# Altium PCB Copy of PCB1.PcbDoc
Units mil, origin at the board's own origin, x right, y up, seen from the top; angles counter-clockwise.
Board outline 6395 x 5300 mil, 2 copper layers (Top Layer, Bottom Layer); 75 components, 141 nets, 408 pads, 2 vias.
Unrouted connection lines stored in the file: 186.
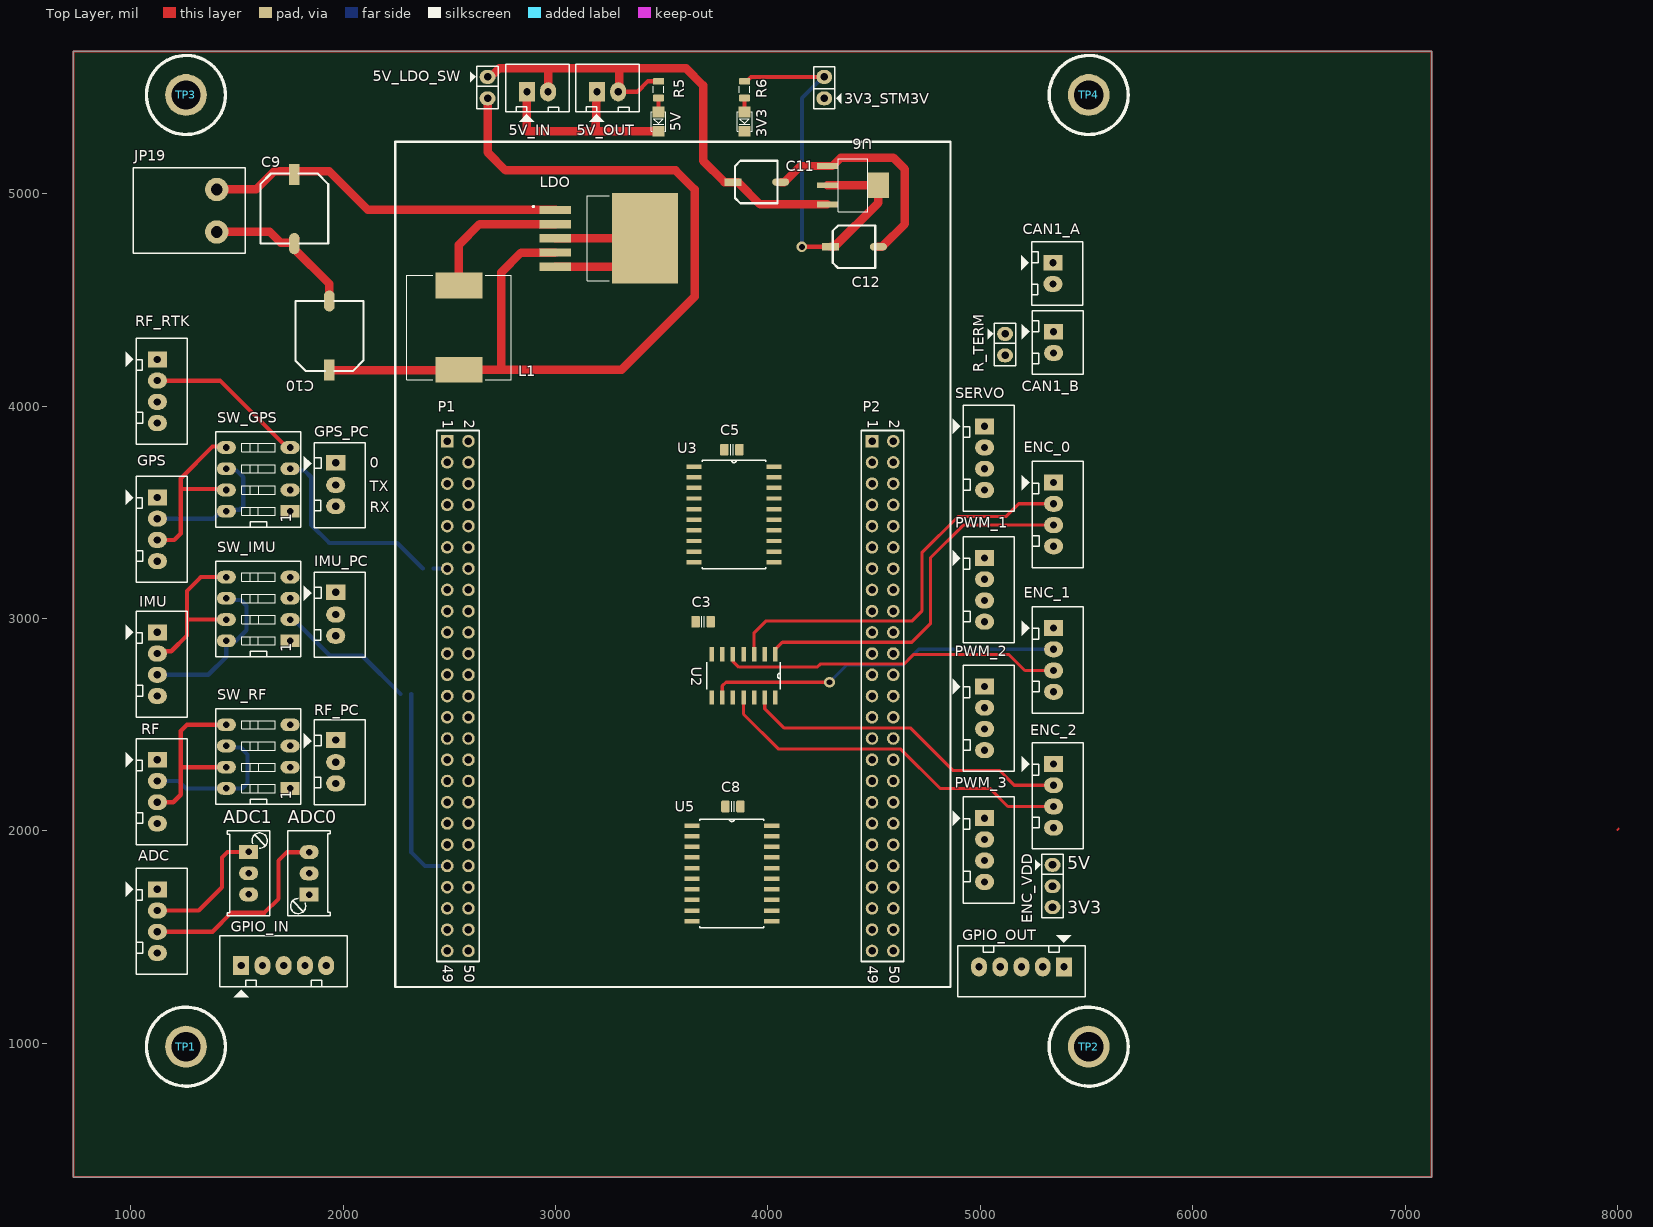
[diagram p0: Top Layer view]
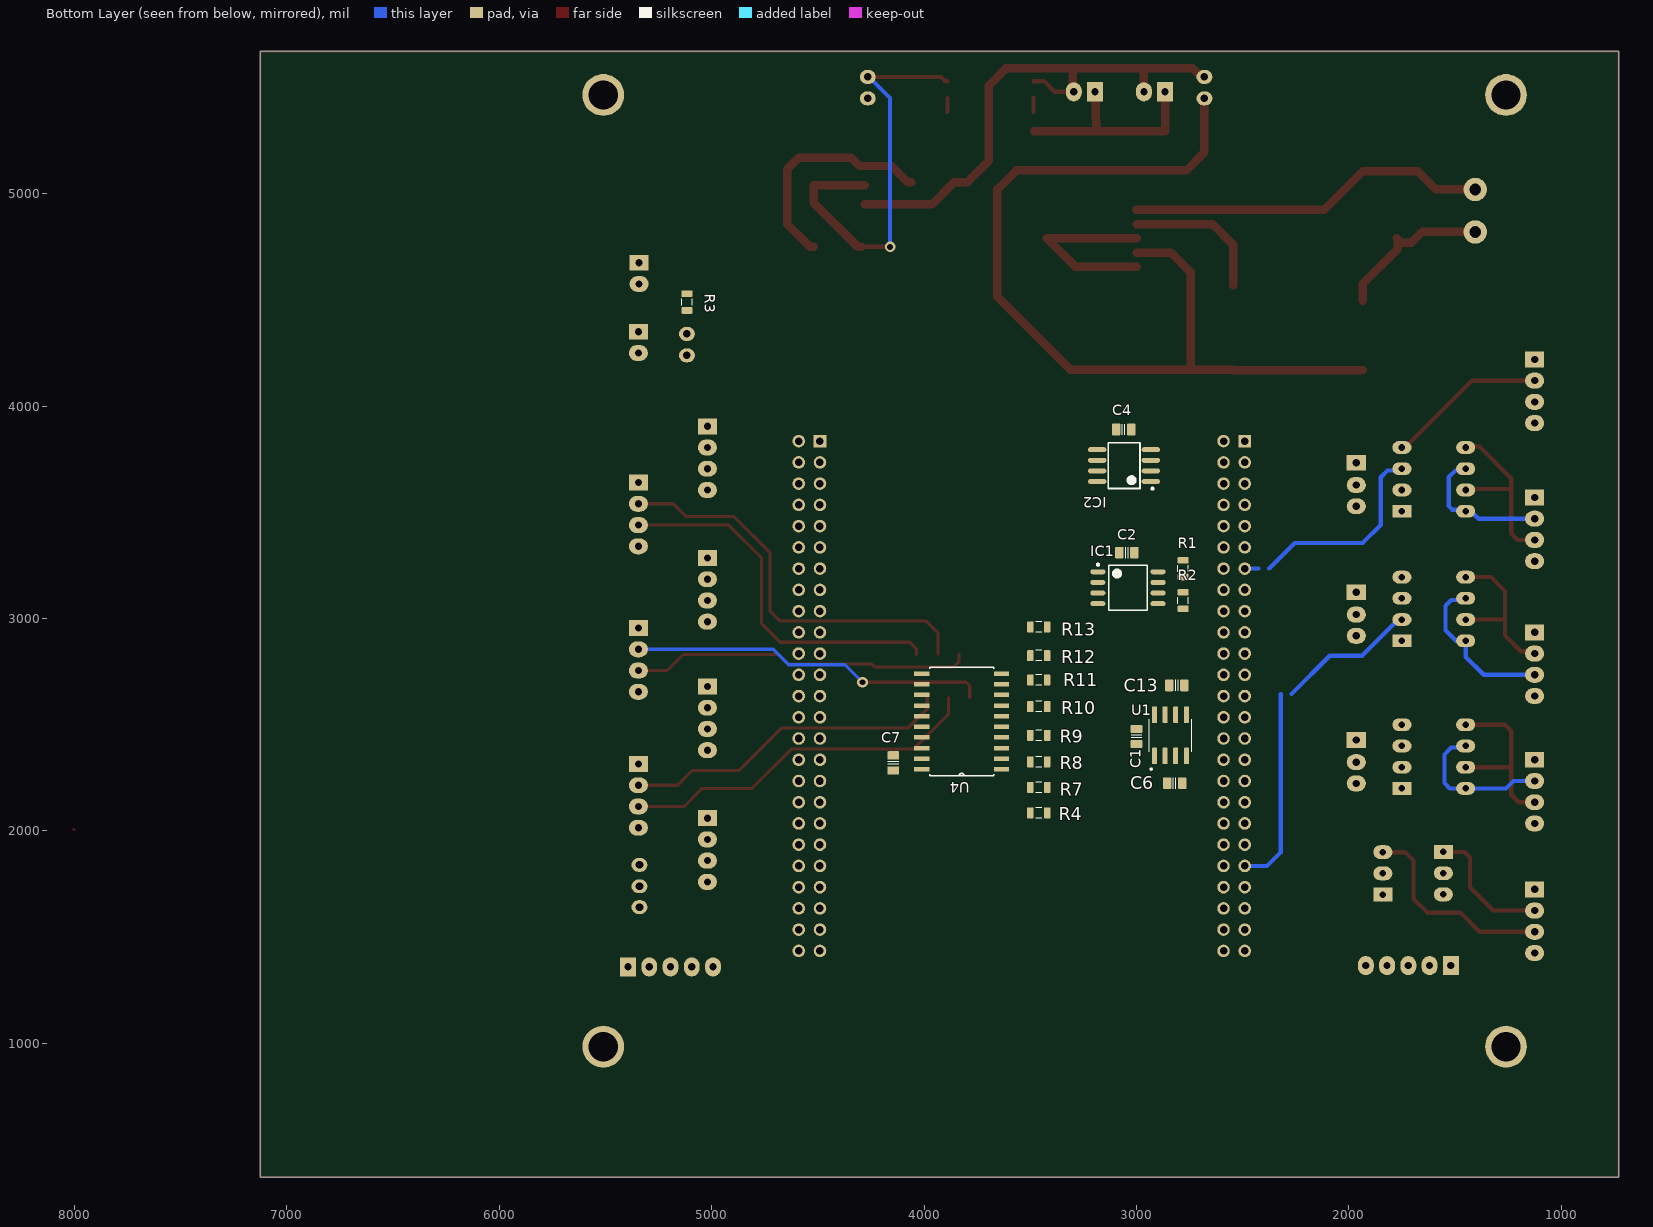
[diagram p1: Bottom Layer view, seen from below]

## Layer stack, top to bottom
Top Solder: solder mask 0.4, Solder Resist, Dk 3.5
Top Layer: signal copper 1.4
Dielectric 1: dielectric 12.6, FR-4, Dk 4.8
Bottom Layer: signal copper 1.4
Bottom Solder: solder mask 0.4, Solder Resist, Dk 3.5

## Board outline
730,370 730,5670 7125,5670 7125,4172.5 7125,1637.5 7125,370

## Design rules (kind name [scope] priority, off if disabled: settings)
Clearance [All] p1: gap=20 ignorepadtopadclearanceinfootprint=FALSE except(10: Arc-THPad Track-THPad; 15: Arc-Arc Arc-Track Track-Track)
PlaneConnect [All] p1: planeconnectstyle=Relief reliefexpansion=20 reliefentries=4 reliefconductorwidth=20 reliefairgap=10
PolygonConnect [All] p1: connectstyle=Relief reliefconductorwidth=20 reliefentries=4 polygonreliefangle="90 Angle" airgapwidth=10
RoutingVias [All] p1: holewidth=28 width=50 viastyle="Through Hole" minholewidth=28 minwidth=50 maxholewidth=28 maxwidth=50
SolderMaskExpansion [All] p1: expansion=4
Width [All] p1: maxlimit=100 minlimit=10 preferedwidth=30 toplayer_prefwidth=20 minimp=50.000000 maximp=50.000000 favimp=50.000000
29 further rules are at their usual default settings.

## Components (designator, comment, footprint, x,y, rotation, side; value= is the part's Value field where it differs from the comment)
3V3 "LED SMD" SM-LED-0805-Red 3890,5385 r270 top
3V3_STM3V "connector" JP2 4265,5449 r90 top
5V "LED SMD" SM-LED-0805-Red 3485,5385 r270 top
5V_IN "connector" CON2 2865,5480 r0 top
5V_LDO_SW "connector" JP2 2680,5550 r270 top
5V_OUT "connector" CON2 3195,5480 r0 top
ADC "JP4" CON4 1125,1725 r270 top value="Connector 4"
ADC0 "10K" VR1 1840,1700 r90 top value="VR 10K"
ADC1 "10K" VR1 1555,1901 r270 top value="VR 10K"
C1 "approved sub OK" CAPC2012X135N 3000,2444.57 r90 bottom value=100nF
C2 "approved sub OK" CAPC2012X135N 3045,3310 r180 bottom value=100nF
C3 "approved sub OK" CAPC2012X135N 3695,2985 r0 top value=100nF
C4 "approved sub OK" CAPC2012X135N 3060,3890 r180 bottom value=100nF
C5 "approved sub OK" CAPC2012X135N 3830,3795 r180 top value=100nF
C6 "approved sub OK" CAPC2012X135N 2820,2225 r180 bottom value=3n3
C7 "approved sub OK" CAPC2012X135N 4145,2320 r270 bottom value=100nF
C8 "approved sub OK" CAPC2012X135N 3835,2115 r180 top value=100nF
C9 "330uF/35V" "cap_A_SMD 470uF/16V" 1605,4765 r0 top
C10 "1000uF/10V" "cap_A_SMD 470uF/16V" 2100,4495 r180 top
C11 "10uF/16V" "cap_A_SMD 10uF/16V" 4030,4980 r90 top
C12 "10uF/16V" "cap_A_SMD 10uF/16V" 4490,4675 r90 top
C13 "approved sub OK" CAPC2012X135N 2810,2685 r0 bottom value=3n3
CAN1_A "JP2" CON2 5341.5,4675 r270 top value="Connector 2"
CAN1_B "JP2" CON2 5345,4350.04 r270 top value="Connector 2"
ENC_0 "Front-Motor" CON4 5345,3640 r270 top value="Connector 4"
ENC_1 "Left-Motor" CON4 5345,2955 r270 top value="Connector 4"
ENC_2 "Right-Motor" CON4 5345,2315 r270 top value="Connector 4"
ENC_VDD "SW" JP3 5340,1740 r270 top value=J2-1
GPIO_IN "GPIO_IN" CON5 1520,1366 r0 top value="Connector 5"
GPIO_OUT "GPIO_OUT" CON5 5393.7,1360 r180 top value="Connector 5"
GPS "GPS" CON4 1125,3570 r270 top value="Connector 4"
GPS_PC "GPS_PC" CON3 1965,3728.5 r270 top value="Connector 3"
IC1 "24C08B/16B_8Lead" SOIC127P800X175-8N 3040,3145 r180 bottom value=24Cxx
IC2 "SN65HVD1050D" SO-8N 2933.14,3795 r0 bottom
IMU "IMU" CON4 1125,2935 r270 top value="Connector 4"
IMU_PC "IMU_PC" CON3 1965,3118.5 r270 top value="Connector 3"
JP19 "7-24V INPUT" "MSTB 2/5.08mm" 1405,4820 r90 top
L1 "100uH/3A" IND_B82477P4104M000 2545,4370 r270 top
LDO "LM2596S-5.0" TO170P1524X483-6N 3250,4790 r0 top
P1 "STMF4_1" HDR2X25 2490,3835 r270 top locked
P2 "STMF4_2" HDR2X25 4490,3835 r270 top locked
PWM_1 "Front-Motor" CON4 5020,3285 r270 top value="Connector 4"
PWM_2 "Left-Motor" CON4 5020,2680 r270 top value="Connector 4"
PWM_3 "Right-Motor" CON4 5020,2060 r270 top value="Connector 4"
R1 "Jumper" RESC2012N_ZERO 2780,3235 r270 bottom value=4k7
R2 "Jumper" RESC2012N_ZERO 2780,3085 r90 bottom value=4k7
R3 "Jumper" RESC2012N_ZERO 5116.5,4490 r270 bottom value=120R
R4 "10k" RESC2012N_ZERO 3460,2085 r180 bottom
R5 "Jumper" RESC2012N_ZERO 3485,5490 r270 top value=330R
R6 "Jumper" RESC2012N_ZERO 3890,5490 r270 top value=330R
R7 "10k" RESC2012N_ZERO 3460,2205 r180 bottom
R8 "10k" RESC2012N_ZERO 3460,2325 r180 bottom
R9 "10k" RESC2012N_ZERO 3460,2450 r180 bottom
R10 "10k" RESC2012N_ZERO 3460,2585 r0 bottom
R11 "10k" RESC2012N_ZERO 3460,2710 r0 bottom
R12 "10k" RESC2012N_ZERO 3460,2825 r0 bottom
R13 "10k" RESC2012N_ZERO 3460,2960 r0 bottom
R_TERM "Jumper 2" JP2 5116.5,4340 r270 top value="JP 2"
RF "RF" CON4 1125,2335 r270 top value="Connector 4"
RF_PC "RF_PC" CON3 1965,2423.5 r270 top value="Connector 3"
RF_RTK "RF_RTK" CON4 1125,4220 r270 top value="Connector 4"
SERVO "SERVO" CON4 5020,3905 r270 top value="Connector 4"
SW_GPS "Select-GPS" DIP8/W0.3K 1750,3505 r90 top value="SW - DIP4"
SW_IMU "Select-IMU" DIP8/W0.3K 1750,2895 r90 top value="SW - DIP4"
SW_RF "Select-RF" DIP8/W0.3K 1750,2200 r90 top value="SW - DIP4"
TP1 "TP" TP6 1260,984.25 r90 top value="Test Point"
TP2 "TP" TP6 5510,984.25 r90 top value="Test Point"
TP3 "TP" TP6 1260,5465 r90 top value="Test Point"
TP4 "TP" TP6 5510,5465 r90 top value="Test Point"
U1 "LM358D" SOIC127P599X175-8N 2840,2450 r90 bottom
U2 "74HC14D" SOIC127P600X175-14N 3885,2730 r270 top
U3 "74HC245D" SOIC127P1032X265-20N 3840,3490 r0 top
U4 "74HC245D" SOIC127P1032X265-20N 3823,2515 r0 bottom
U5 "74HC245D" SOIC127P1032X265-20N 3830,1800 r0 top
U6 "LM1117-3.3V" LM1117-SOP 4330,5040 r270 top

## Footprints (in the part's own frame and the unit in brackets; to place one, negate y for a bottom-side part, rotate by r counter-clockwise, add the part's x,y. Pads: shape width x height; smd on the part's side, far side on the other; paste and mask are expansions set on the pad)
"cap_A_SMD 10uF/16V" [mil]
  rect 35x80 smd: 1(75,195)
  oval 35x80 smd: 2(75,-30)
  silkscreen extent -25,-15 175,185, body extent -29,-33 179,203, height 232
"cap_A_SMD 470uF/16V" [mil]
  rect 50x100 smd: 1(165,325)
  oval 50x100 smd: 2(165,0)
  silkscreen extent 5,0 325,330, body extent 2,-12 328,342, height 469
CAPC2012X135N [mm] "Chip Capacitor, Body 2.0x1.2mm, EIA 0805, IPC Medium Density"
  round 0.254 on Mech15: 0(0,0)
  rrect25% 1x1.4 smd: 1(-0.9,0) 2(0.9,0)
  Top Layer pour cut-out: -0.675,0.7 -0.475,0.9 0.475,0.9 0.675,0.7 0.675,-0.7 0.475,-0.9 -0.475,-0.9 -0.675,-0.7
  silkscreen extent -0.15,-0.65 0.15,0.65, body extent -1.1,-0.72 1.1,0.73, height 1.34
CON2 [mil]
  rect 75x90 hole 34: 1(0,0)
  oval 75x90 hole 34: 2(100,0)
  silkscreen extent -100,-140 200,130, body extent -95,-93 196,133, height 281
CON3 [mil] "CON 3 - Header White"
  rect 75x90 hole 34: 1(-5,0)
  oval 75x90 hole 34: 2(100,0) 3(200,0)
  silkscreen extent -100,-150 300,140, body extent -94,-94 296,133, height 276
CON4 [mil]
  rect 75x90 hole 34: 1(0,0)
  oval 75x90 hole 34: 2(100,0) 3(200,0) 4(300,0)
  silkscreen extent -100,-150 400,140, body extent -90,-90 398,136, height 276
CON5 [mil] "CON5"
  rect 75x90 hole 34: 1(0,0)
  oval 75x90 hole 34: 2(100,0) 3(200,0) 4(300,0) 5(400,0)
  silkscreen extent -100,-150 500,140, body extent -93,-94 493,132, height 276
DIP8/W0.3K [mil] "8 PIN, W 400mil , L 450mil, Pin to pin 100mil For Switch"
  rect 60x90 hole 31: 1(0,0)
  oval 60x90 hole 31: 2(100,0) 3(200,0) 4(300,0) 5(300,300) 6(200,300) 7(100,300) 8(0,300)
  silkscreen extent -75,-50 375,350, body extent -80,-45 378,345, height 158
HDR2X25 [mm] "Connector; Header; 25x2 Position"
  rect 1.5x1.5 hole 0.9: 1(0,0)
  round 1.5 hole 0.9: 2(0,2.54) 3(2.54,0) 4(2.54,2.54) 5(5.08,0) 6(5.08,2.54) 7(7.62,0) 8(7.62,2.54) 9(10.16,0) 10(10.16,2.54) 11(12.7,0) 12(12.7,2.54) 13(15.24,0) 14(15.24,2.54) 15(17.78,0) 16(17.78,2.54) 17(20.32,0) 18(20.32,2.54) 19(22.86,0) 20(22.86,2.54) 21(25.4,0) 22(25.4,2.54) 23(27.94,0) 24(27.94,2.54) 25(30.48,0) 26(30.48,2.54) 27(33.02,0) 28(33.02,2.54) 29(35.56,0) 30(35.56,2.54) 31(38.1,0) 32(38.1,2.54) 33(40.64,0) 34(40.64,2.54) 35(43.18,0) 36(43.18,2.54) 37(45.72,0) 38(45.72,2.54) 39(48.26,0) 40(48.26,2.54) 41(50.8,0) 42(50.8,2.54) 43(53.34,0) 44(53.34,2.54) 45(55.88,0) 46(55.88,2.54) 47(58.42,0) 48(58.42,2.54) 49(60.96,0) 50(60.96,2.54)
  silkscreen extent -1.27,-1.27 62.23,3.81, body extent -1.27,-1.27 62.23,3.81, height 1.5
IND_B82477P4104M000 [mm]
  rect 3.1x5.6 smd: 1(-5.05,0) 2(5.05,0)
  silkscreen extent -6.25,-6.25 6.25,6.25
JP2 [mil]
  oval 65x75 hole 36: 1(0,0) 2(101,0)
  silkscreen extent -50,-81 150,50, body extent -48,-50 148,48, height 323
JP3 [mil] "Jumper 3"
  oval 65x75 hole 36: 1(-100,0) 2(1,0) 3(99,0)
  silkscreen extent -150,-81 150,50, body extent -150,-60 150,55, height 355
LM1117-SOP [mm]
  rect 0.7x2.54 smd: 1(-2.3,-1.27) 2(0,-1.27) 3(2.3,-1.27)
  rect 3x2.54 smd: 2(0,4.826)
  silkscreen extent -3.18,0 3.17,3.56, body extent -3.25,-1.78 3.25,5.18, height 1.68
"MSTB 2/5.08mm" [mil]
  round 110 hole 55.12: 1(0,0) 2(200,0)
  silkscreen extent -101,-134 302,394, body extent -100,-79 300,394, height 339
RESC2012N_ZERO [mm] "Chip Resistor, Body 2.0x1.2mm, 0805, IPC Medium Density"
  round 0.254 on Mech15: 0(0,0)
  rrect25% 0.8x1.3 smd: 1(-1,0) 2(1,0)
  Top Layer pour cut-out: -0.725,0.65 -0.525,0.85 0.525,0.85 0.725,0.65 0.725,-0.65 0.525,-0.85 -0.525,-0.85 -0.725,-0.65
  silkscreen extent -0.38,-0.64 0.38,0.64, body extent -1.1,-0.67 1.1,0.68, height 0.69
SM-LED-0805-Red [mil]
  rect 50x55 smd: 1(0,0) 2(90,0)
  silkscreen extent 0,-35 90,35, body extent 5,-25 85,25, height 43
SO-8N [mm] "SOP, 8-Leads, Body 5.3x5.3mm, Pitch 1.27mm, IPC Medium Density"
  oval 2.2x0.6 smd: 1(-0.022,3.81) 2(-0.022,2.54) 3(-0.022,1.27) 4(-0.022,0) 5(6.397,0) 6(6.397,1.27) 7(6.397,2.54) 8(6.397,3.81)
  silkscreen extent -0.35,-0.84 5.08,4.78, body extent 0.08,-0.48 6.27,4.34, height 1.7
SOIC127P599X175-8N [mm]
  rrect25% 1.97x0.6 smd: 1(-2.47,1.905) 2(-2.47,0.635) 3(-2.47,-0.635) 4(-2.47,-1.905) 5(2.47,-1.905) 6(2.47,-0.635) 7(2.47,0.635) 8(2.47,1.905)
  silkscreen extent -4.14,-2.52 1.95,2.52
SOIC127P600X175-14N [mil]
  rect 67x21 smd: 1(-102,150) 2(-102,100) 3(-102,50) 4(-102,0) 5(-102,-50) 6(-102,-100) 7(-102,-150) 8(102,-150) 9(102,-100) 10(102,-50) 11(102,0) 12(102,50) 13(102,100) 14(102,150)
  silkscreen extent -63,-172 63,172, body extent -118,-170 118,170, height 69
SOIC127P800X175-8N [mm] "SOIC, 8-Leads, Body 5.24x5.29mm, Pitch 1.27mm, IPC Medium Density"
  oval 1.8x0.6 smd: 1(-3.6,1.905) 2(-3.6,0.635) 3(-3.6,-0.635) 4(-3.6,-1.905) 5(3.6,-1.905) 6(3.6,-0.635) 7(3.6,0.635) 8(3.6,1.905)
  silkscreen extent -3.73,-2.7 2.3,2.88, body extent -3.99,-2.7 3.99,2.7, height 1.75
SOIC127P1032X265-20N [mil]
  rect 71x21 smd: 1(-188,225) 2(-188,175) 3(-188,125) 4(-188,75) 5(-188,25) 6(-188,-25) 7(-188,-75) 8(-188,-125) 9(-188,-175) 10(-188,-225) 11(188,-225) 12(188,-175) 13(188,-125) 14(188,-75) 15(188,-25) 16(188,25) 17(188,75) 18(188,125) 19(188,175) 20(188,225)
  silkscreen extent -150,-256 150,256
TO170P1524X483-6N [mm]
  rect 3.79x0.99 smd: 1(-6.4,3.4) 2(-6.4,1.7) 3(-6.4,0) 4(-6.4,-1.7) 5(-6.4,-3.4)
  rect 7.88x10.84 smd paste-6: 6(4.35,0)
  silkscreen extent -9.1,-5.08 0.09,5.08, body extent -7.18,-5.08 7.18,5.08, height 4.65
TP6 [mm] "Jac cap 6ly"
  round 5 hole 3.5: 1(0,0)
  silkscreen extent -4.72,-4.72 4.72,4.72
VR1 [mil] "Variable Resistor"
  rect 65x90 hole 30: 1(0,0)
  oval 65x90 hole 30: 2(100,0) 3(200,0)
  silkscreen extent -100,-100 301,100, body extent -88,-130 288,110, height 455

## Part data
3V3 5V: library part "LED SMD 0805"
3V3_STM3V 5V_IN 5V_LDO_SW 5V_OUT JP19: library part Con2, "connector 2"
ADC ENC_0 ENC_1 ENC_2 GPS IMU PWM_1 PWM_2 PWM_3 RF RF_RTK SERVO: library part Con4, "Connector 4"
ADC0 ADC1: library part VR, "Var Resistor"
C1 C2 C3 C4 C5 C6 C7 C8 C13: library part "CAP C_0805", "Capacitor SMD Cer 1.8nF 10% 50V X7R 0805", Manufacturer 1="AVX Corporation", Manufacturer Part Number 1=08055C182KAT2A, Operating Temperature="-55°C ~ 125°C", Package / Case="0805 (2012 metric)", Ratings="50V; X7R", Supplier Part Number 1=478-1374-1-ND, Tolerance=±10%, SCDType=source*, Supplier 1=Digi-Key
C9 C10 C11 C12: library part "CAP hoa", "Cap"
CAN1_A CAN1_B: library part Con2, "Connector 2"
ENC_VDD: library part "JP 2-1", "Jumper 2-1"
GPIO_IN GPIO_OUT: library part Con5, "Connector 5"
GPS_PC IMU_PC RF_PC: library part Con3, "Connector 3"
IC1: "Standard 2-Wire Bus Interface Serial EEPROM", Copyright by=VanDungEvn
IC2: "CAN DRIVER"
L1: library part B82477P4104M000, Package=None, Availability="In Stock", Check_prices=https://www.snapeda.com/parts/B82477P4104M000/TM+Electronics/view-part/?ref=eda, MF="TDK ELECTRONICS", MP=B82477P4104M000, Price=None, Purchase-URL=https://pricing.snapeda.com/search/part/B82477P4104M000/?ref=eda, SnapEDA_Link=https://www.snapeda.com/parts/B82477P4104M000/TM+Electronics/view-part/?ref=snap
LDO: "SIMPLE SWITCHER&reg; 4.5V to 40V, 3A Low Component Count Step-Down Regulator", Package="TO-263-5 Texas Instruments", Availability="In Stock", Check_prices=https://www.snapeda.com/parts/LM2596S-5.0/NOPB/Texas+Instruments/view-part/?ref=eda, MF="Texas Instruments", MP=LM2596S-5.0/NOPB, Price=None, Purchase-URL=https://pricing.snapeda.com/search/part/LM2596S-5.0/NOPB/?ref=eda, SnapEDA_Link=https://www.snapeda.com/parts/LM2596S-5.0/NOPB/Texas+Instruments/view-part/?ref=snap
P1 P2: library part "Header 25X2", "Header, 25-Pin, Dual row", LatestRevisionDate=17-Jul-2002, LatestRevisionNote="Re-released for DXP Platform.", Publisher="Altium Limited"
R1 R2 R3 R5 R6: library part RES_0805, "Resistor SMD chip 0.0 Ohm 0.125W 0805", Manufacturer 1="Samsung Electro-Mechanics America, Inc", Manufacturer 2="Stackpole Electronics Inc", Manufacturer 3=Yageo, Manufacturer 4="Panasonic Electronic Components", Manufacturer 5="Rohm Semiconductor", Manufacturer Part Number 1=RC2012J000CS, Manufacturer Part Number 2=RMCF0805ZT0R00, Manufacturer Part Number 3=RC0805JR-070RL, Manufacturer Part Number 4=ERJ-6GEY0R00V, Manufacturer Part Number 5=MCR10ERTJ000, Package / Case="0805 (2012 metric)", Ratings=1/8W, Supplier Part Number 1=1276-5466-6-ND, Tolerance=N/A, ComponentLink1Description=http://www.samsungsem.com/servlet/FileDownload?filename=productcatalog/pdf/Chip_Resistor.pdf, ComponentLink1URL=http://www.samsungsem.com/servlet/FileDownload?filename=productcatalog/pdf/Chip_Resistor.pdf, ComponentLink2Description=http://www.seielect.com/Catalog/SEI-RMCF_RMCP.pdf, ComponentLink2URL=http://www.seielect.com/Catalog/SEI-RMCF_RMCP.pdf, ComponentLink3Description=http://media.digikey.com/pdf/Data%20Sheets/Yageo%20PDFs/RC0805%20Pb%20Free.pdf, ComponentLink3URL=http://media.digikey.com/pdf/Data%20Sheets/Yageo%20PDFs/RC0805%20Pb%20Free.pdf, ComponentLink4Description=http://industrial.panasonic.com/www-cgi/jvcr13pz.cgi?E+PZ+3+AOA0001+ERJ6GEY0R00V+7+WW, ComponentLink4URL=http://industrial.panasonic.com/www-cgi/jvcr13pz.cgi?E+PZ+3+AOA0001+ERJ6GEY0R00V+7+WW, ComponentLink5Description=http://rohmfs.rohm.com/en/products/databook/datasheet/passive/resistor/chip_resistor/mcr_g.pdf, ComponentLink5URL=http://rohmfs.rohm.com/en/products/databook/datasheet/passive/resistor/chip_resistor/mcr_g.pdf, RoHS 1="RoHS Compliant", RoHS 2="RoHS Compliant", RoHS 3="RoHS Compliant", RoHS 4="RoHS Compliant", RoHS 5="RoHS Compliant", SCDType=spec, Supplier 1=Digi-Key, Supplier 2=Digi-Key, Supplier 3=Digi-Key, Supplier 4=Digi-Key, Supplier 5=Digi-Key, Supplier Part Number 2=RMCF0805ZT0R00DKR-ND, Supplier Part Number 3=311-0.0ARDKR-ND, Supplier Part Number 4=P0.0ADKR-ND, Supplier Part Number 5=RHM0.0CPDKR-ND
R4 R7 R8 R9 R10 R11 R12 R13: library part Res, "Res"
R_TERM: library part "JP 2"
SW_GPS SW_IMU SW_RF: library part SWDIP-4, "DIP Switch, 4 Position, SPST"
TP1 TP2 TP3 TP4: library part TP1, "Test Point"
U1: "Dual standard operational amplifier 8-SOIC 0 to 70", Package="SOIC-8 Texas Instruments", Arrow_Asia-Purchase-URL=https://snapeda.com/shop?store=Arrow+Asia&id=4793021, Arrow_Electronics-Purchase-URL=https://snapeda.com/shop?store=Arrow+Electronics&id=4793021, Check_prices=https://www.snapeda.com/parts/LM358D/Texas%20Instruments/view-part/4793021/?ref=eda, Digi-Key_Part_Number=296-1014-2-ND, DigiKey-Purchase-URL=https://snapeda.com/shop?store=DigiKey&id=4793021, MF="Texas Instruments", Mouser-Purchase-URL=https://snapeda.com/shop?store=Mouser&id=4793021, MP=LM358D, SnapEDA_Link=https://www.snapeda.com/parts/LM358D/Texas%20Instruments/view-part/4793021/?ref=snap, Texas_Instruments-Purchase-URL=https://snapeda.com/shop?store=Texas+Instruments&id=4793021
U2: "Inverter IC 6 Channel Schmitt Trigger 14-SOIC", Package="SO14-14 Nexperia USA Inc.", Availability="In Stock", Check_prices=https://www.snapeda.com/parts/74HC14D/Toshiba+Semiconductor+and+Storage/view-part/?ref=eda, MF=Toshiba, MP=74HC14D, Price=None, Purchase-URL=https://pricing.snapeda.com/search/part/74HC14D/?ref=eda, SnapEDA_Link=https://www.snapeda.com/parts/74HC14D/Toshiba+Semiconductor+and+Storage/view-part/?ref=snap
U3 U4 U5: "Transceiver, Non-Inverting 1 Element 8 Bit per Element 3-State Output 20-SOIC", Package="SOIC-20 Toshiba Semiconductor", Availability="In Stock", Check_prices=https://www.snapeda.com/parts/74HC245D/Toshiba+Semiconductor+and+Storage/view-part/?ref=eda, MF=Toshiba, MP=74HC245D, Price=None, Purchase-URL=https://pricing.snapeda.com/search/part/74HC245D/?ref=eda, SnapEDA_Link=https://www.snapeda.com/parts/74HC245D/Toshiba+Semiconductor+and+Storage/view-part/?ref=snap
U6: library part LM1117, "800mA Low-Dropout Linear Regulator", Creator="Nguyen Ba Bien", Website=http://group3i.net

## Via types
v1: diameter 50, hole 28, Top Layer to Bottom Layer, 2 vias

## Nets (pads, with @x,y where several pads share a name; then routed paths per layer and width w, separated by ;. In a path a pad name is that pad's centre, name@x,y a point inside that pad or via, vN(x,y) a via of type N, cw(c..) or ccw(c..) an arc to the next point about the centre after c; other vN are vias at no path point)
3V3: 3V3_STM3V.2 C2.2 C4.2 C5.2 C7.2 C8.2 C12.1 ENC_VDD.3 IC1.8 IC2.3 R1.1 R2.1 R4.2 R6.1 R7.2 R8.2 R9.2 U3.1 U3.20 U4.1 U4.20 U5.1 U5.20 U6.2 | length 1998.4
  Top Layer w20: R6.1 3899.84,5529.37 3920.47,5550 3V3_STM3V.2 ; v1(4160,4750) C12.1
  Top Layer w40: U6.2@4280,5040 4520,5040 4520,4957.5 4312.5,4750 C12.1
  Bottom Layer w20: v1(4160,4750) 4160,5450 4260,5550 3V3_STM3V.2
5V: 5V_IN.2 5V_LDO_SW.1 5V_OUT.2 ADC.4 C1.2 C11.1 ENC_VDD.1 GPS.4 IMU.4 P2.3 P2.4 R5.1 RF.4 RF_RTK.4 U1.8 U6.3 | length 2536.6
  Top Layer w20: 5V_OUT.2 3385,5480 3435,5530 R5.1@3484.37,5530
  Top Layer w40: 5V_LDO_SW.1 2694.47,5550 2734.47,5590 2965,5590 ; 5V_IN.2 2965,5590 ; U6.3 3963.05,4949.45 3857.5,5055 C11.1 3795,5055 3695,5155 3695,5510 3615,5590 3300,5590 ; 2965,5590 3300,5590 ; 5V_OUT.2@3300,5492.5 3300,5590 ; 5V_OUT.2@3300,5492.5 3300,5485 5V_OUT.2 3295,5487.5 5V_OUT.2@3300,5492.5
5V_OUT: L1.1 LDO.2 | length 684.4
  Top Layer w40: L1.1 2545,4760 2641.93,4856.93 LDO.2
5V_R: 5V_LDO_SW.2 C10.1 L1.2 LDO.4 | length 4419.8
  Top Layer w40: C10.1 2543.82,4170 L1.2 2745,4171.18 ; 5V_LDO_SW.2 2680,5195 2765,5110 3565,5110 3655,5020 3655,4515 3311.18,4171.18 2745,4171.18 ; LDO.4 2838.07,4723.07 2745,4630 2745,4171.18
ADC0: ADC0.3 ADC.3 | length 975.8
  Top Layer w20: ADC.3 1385,1525 1475,1615 1630,1615 1695,1680 1695,1860 1735,1900 ADC0.3
ADC1: ADC1.1 ADC.2 | length 626.3
  Top Layer w20: ADC.2 1320,1625 1430,1735 1430,1875 1456,1901 ADC1.1
ADC1_IN14: P1.20 U1.1 U1.2
ADC2_IN13: P1.9 U1.6 U1.7
BOOT0: P2.21
CAN1_RX: P2.36
CAN1_TX: P2.33
CAN2_RX: IC2.4 P1.36
CAN2_TX: IC2.1 P1.37
EEP_SCL: IC1.6 P2.19 R1.2
EEP_SDA: IC1.5 P2.24 R2.2
ENC_A0: P1.27 U2.2
ENC_A1: P2.25 U2.6
ENC_A2: P1.15 U2.10
ENC_B0: P1.29 U2.4
ENC_B1: P2.26 U2.8 U3.6 U5.2 U5.6
ENC_B2: P2.28 U2.12
ENCA0: ENC_0.3 U2.1 | length 1756.9
  Top Layer w15: U2.1 4035,2855 4067.97,2887.97 4677.97,2887.97 4765,2975 4765,3285 4920,3440 ENC_0.3
ENCA1: ENC_1.3 U2.5 | length 1610
  Top Layer w15: U2.5 3835,2799.11 3863.11,2771 4231,2771 4245.5,2785.5 4640.5,2785.5 4685,2830 5135,2830 5210,2755 ENC_1.3
ENCA2: ENC_2.3 U2.11 | length 1718.2
  Top Layer w15: U2.11 3885,2550 4050,2385 4625,2385 4810,2200 5045,2200 5130,2115 ENC_2.3
ENCB0: ENC_0.2 U2.3 | length 1923.5
  Top Layer w15: U2.3 3935,2932.97 3990,2987.97 4677.97,2987.97 4725,3035 4725,3310 4895,3480 5120,3480 5180,3540 ENC_0.2
ENCB1: ENC_1.2 U2.9 | length 1686
  Top Layer w15: U2.9 3785,2682.61 3802.39,2700 v1(4290,2700)
  Bottom Layer w15: v1(4290,2700) 4372.03,2782.03 4637.03,2782.03 4710,2855 ENC_1.2
ENCB2: ENC_2.2 U2.13 | length 1562.1
  Top Layer w15: U2.13 3985,2575 4075,2485 4670,2485 4870,2285 5090,2285 5160,2215 ENC_2.2
GND: 3V3.2 5V.2 5V_IN.1 5V_OUT.1 ADC0.1 ADC1.3 ADC.1 C1.1 C2.1 C3.1 C4.1 C5.1 C6.2 C7.1 C8.1 C9.2 C10.2 C11.2 C12.2 C13.2 ENC_0.1 ENC_1.1 ENC_2.1 GPIO_IN.1 GPIO_OUT.1 GPS.1 GPS_PC.1 IC1.1 IC1.2 IC1.3 IC1.4 IC1.7 IC2.2 IC2.8 IMU.1 IMU_PC.1 JP19.1 LDO.3 LDO.5 LDO.6 P1.1 P1.2 P1.5 P1.23 P1.49 P1.50 P2.1 P2.2 P2.49 P2.50 PWM_1.4 PWM_2.4 PWM_3.4 R10.1 R11.1 R12.1 R13.1 RF.1 RF_PC.1 RF_RTK.1 SERVO.4 U1.4 U2.7 U3.10 U3.19 U4.10 U4.19 U5.10 U5.19 U6.1 | length 3726.5
  Top Layer w40: JP19.1 1655,4820 1705,4770 1755,4770 1770,4785 C9.2@1770,4784.49 ; C9.2@1775,4789.49 C9.2@1770,4784.49 ; C10.2 1935,4575 1770,4740 C9.2 C9.2@1770,4784.49 ; 5V_IN.1 2865,5295 3181.12,5295 3190.25,5304.13 ; LDO.3@2997.52,4789.49 LDO.3 LDO.6 3287.4,4656.14 LDO.5 ; 5V_OUT.1@3195,5475 3190.25,5304.13 ; 5V.2@3480,5295 3190,5295 3190.25,5304.13 ; C11.2 4077.5,5055 4153.05,5130.55 U6.1 4303.78,5130.55 4343.23,5170 4590,5170 4645,5115 4645,4857.5 4537.5,4750 C12.2
GPS_RX: GPS.3 SW_GPS.5 SW_GPS.7 | length 878.7
  Top Layer w20: GPS.3 1205,3370 1235,3400 1235,3610 ; SW_GPS.7 1445,3610 1235,3610 ; SW_GPS.5 1445,3810 1385,3810 1235,3660 1235,3610
GPS_RX_MCU: P1.13 SW_GPS.3 | length 1016.5
  Bottom Layer w20: SW_GPS.3 1757.65,3697.35 1817.65,3697.35 1850,3665 1850,3440 1935,3355 2255,3355 2375,3235 ; 2425,3235 P1.13
GPS_RX_PC: GPS_PC.3 SW_GPS.1
GPS_TX: GPS.2 SW_GPS.6 SW_GPS.8 | length 661.4
  Bottom Layer w20: GPS.2 1389.18,3470 1424.18,3505 SW_GPS.8 1457.65,3512.65 1512.65,3512.65 1530,3530 1530,3665 1497.65,3697.35 1457.65,3697.35 SW_GPS.6
GPS_TX_MCU: P1.14
GPS_TX_PC: GPS_PC.2 SW_GPS.2
IMU_RX: IMU.3 SW_IMU.6 SW_IMU.8 | length 775.4
  Bottom Layer w20: IMU.3 1365,2735 1450,2820 SW_IMU.8 1495,2895 1545,2945 1545,3060 1517.65,3087.35 1457.65,3087.35 SW_IMU.6
IMU_RX_MCU: P1.40 SW_IMU.3
IMU_RX_PC: IMU_PC.3 SW_IMU.1
IMU_TX: IMU.2 SW_IMU.5 SW_IMU.7 | length 782.1
  Top Layer w20: IMU.2 1135.52,2845.52 1190.52,2845.52 1265,2920 1265,2995 ; SW_IMU.7 1265,2995 ; SW_IMU.5 1330,3195 1265,3130 1265,2995
IMU_TX_MCU: P1.41 SW_IMU.4 | length 941.9
  Bottom Layer w20: 2320,2645 2320,1900 2385,1835 P1.41
IMU_TX_PC: IMU_PC.2 SW_IMU.2 | length 665
  Bottom Layer w20: SW_IMU.2 1767.43,2995 1937.43,2825 2090,2825 2270,2645
IN0: GPIO_IN.5 R4.1 U4.2
IN1: GPIO_IN.4 R7.1 U4.3
IN2: GPIO_IN.3 R8.1 U4.4
IN3: GPIO_IN.2 R9.1 U4.5
IN_0: P2.11 U4.18
IN_1: P2.14 U4.17
IN_2: P2.13 U4.16
IN_3: P2.16 U4.15
NC: P1.48
Net3V3_1: 3V3.1 R6.2 | length 65.6
  Top Layer w20: 3V3.1 R6.2
Net5V_1: 5V.1 R5.2 | length 65.6
  Top Layer w20: 5V.1 R5.2
NET_H: CAN1_A.2 CAN1_B.2 IC2.7 R3.1
NET_L: CAN1_A.1 CAN1_B.1 IC2.6 R_TERM.2
NetADC0_2: ADC0.2 C6.1 U1.3
NetADC1_2: ADC1.2 C13.1 U1.5
NetR3_2: R3.2 R_TERM.1
NRST: P1.6
OUT0: GPIO_OUT.5 U4.14
OUT1: GPIO_OUT.4 U4.13
OUT2: GPIO_OUT.3 U4.12
OUT3: GPIO_OUT.2 U4.11
OUT_0: P2.7 R10.2 U4.6
OUT_1: P2.8 R11.2 U4.7
OUT_2: P2.12 R12.2 U4.8
OUT_3: P2.9 R13.2 U4.9
PA0: P1.12
PA1: P1.11
PA4: P1.16 P1.18 U5.4
PA6: U5.3
PA7: P1.17
PA8: P2.43
PA9: P2.44
PA10: P2.41
PA13: P2.42
PA14: P2.39
PA15: P2.40
PB0: P1.22 P1.24
PB1: P1.21
PB6: P2.23
PB9: P2.20
PB10: P1.34
PB11: P1.35
PB14: P1.38
PB15: P1.39 U3.4
PC0: P1.8 U5.8
PC1: P1.7 U5.7
PC2: P1.10
PC5: P1.19 U3.8
PC6: P2.47
PC7: P2.48
PC8: P2.45
PC9: P2.46
PC10: P2.37 SW_RF.4
PC11: P2.38 SW_RF.3
PC12: P2.35
PC15: P2.10
PD2: P2.34
PD3: P2.31
PD4: P2.32
PD5: P2.29
PD6: P2.30
PD7: P2.27
PD10: P1.42 U3.3
PD11: P1.43 U3.7
PD12: P1.44
PD13: P1.45
PD14: P1.46
PD15: P1.47
PE0: P2.17
PE1: P2.18
PE2: P2.15
PE7: P1.25
PE8: P1.26
PE10: P1.28
PE12: P1.30
PE13: P1.31
PE14: P1.32
PE15: P1.33
PWM0: SERVO.1 U3.18
PWM0_DIR+: SERVO.3 U3.16
PWM0_DIR-: SERVO.2 U3.17
PWM1: PWM_1.1 U3.14
PWM1_DIR+: PWM_1.3 U3.12
PWM1_DIR-: PWM_1.2 U3.13
PWM2: PWM_2.1 U5.18
PWM2_DIR+: PWM_2.3 U5.16
PWM2_DIR-: PWM_2.2 U5.17
PWM3: PWM_3.1 U5.14
PWM3_DIR+: PWM_3.3 U5.12
PWM3_DIR-: PWM_3.2 U5.13
PWM_0: U3.2
RF_RTK_RX: RF_RTK.3
RF_RTK_TX: RF_RTK.2 SW_GPS.4 | length 755.5
  Top Layer w20: RF_RTK.2 1420,4120 1735,3805 SW_GPS.4
RF_RX: RF.3 SW_RF.5 SW_RF.7 | length 874
  Top Layer w20: RF.3 1200,2135 1235,2170 1235,2295 ; SW_RF.7 1240,2300 ; SW_RF.5 1265,2500 1235,2470 1235,2300 ; 1235,2295 1235,2300 ; 1235,2295 1240,2300 ; 1235,2300 1240,2300
RF_RX_PC: RF_PC.3 SW_RF.1
RF_TX: RF.2 SW_RF.6 SW_RF.8 | length 696.4
  Bottom Layer w20: RF.2 1225,2235 1260,2200 ; 1265,2200 1355,2200 1525,2200 1550,2225 1550,2360 1517.65,2392.35 1457.65,2392.35 SW_RF.6
RF_TX_PC: RF_PC.2 SW_RF.2
STM_3V_OUT: 3V3_STM3V.1 P2.5 P2.6
VCC_ENC: C3.2 ENC_0.4 ENC_1.4 ENC_2.4 ENC_VDD.2 U2.14
VDD_OUT: P1.3 P1.4 P2.22
VIN: C9.1 JP19.2 LDO.1 | length 1705.2
  Top Layer w40: JP19.2 1590,5020 1675,5105 1770,5105 1935,5105 2116.14,4923.86 LDO.1 LDO.1@3000,4923.86
pads on no net: C1.0 C2.0 C3.0 C4.0 C5.0 C6.0 C7.0 C8.0 C13.0 IC2.5 R1.0 R2.0 R3.0 R4.0 R5.0 R6.0 R7.0 R8.0 R9.0 R10.0 R11.0 R12.0 R13.0 TP1.1 TP2.1 TP3.1 TP4.1 U3.5 U3.9 U3.11 U3.15 U5.5 U5.9 U5.11 U5.15
copper on no net: | length 23397.1
  Top Layer w10: 8000,2004.96 8005,2009.96 ; 730,370 730,5670 1265,5670 2787.5,5670 5372.5,5670 7125,5670 7125,4172.5 7125,1637.5 7125,370 7095,370 770,370 730,370

## Silkscreen, mask and mechanical layers (free items; w line width, h text height)
Top Overlay:
  lines w10: 2245,1265 2460,1265 4860,1265 4860,5245 2245,5245 2245,1265
  text "0" at 2125,3710 h50
  text "TX" at 2125,3600 h50
  text "RX" at 2125,3500 h50
  text "5V" at 5410,1820 h60
  text "3V3" at 5410,1610 h60

## Text inside footprints (layer, text, board x,y; h text height)
P1: Top Overlay "2" at 2570,3935 h50 r270; Top Overlay "1" at 2470,3935 h50 r270; Top Overlay "49" at 2470,1370 h50 r270; Top Overlay "50" at 2570,1370 h50 r270
P2: Top Overlay "2" at 4570,3935 h50 r270; Top Overlay "1" at 4470,3935 h50 r270; Top Overlay "49" at 4470,1365 h50 r270; Top Overlay "50" at 4570,1365 h50 r270
SW_GPS: Top Overlay "1" at 1756,3451 h50 r90
SW_IMU: Top Overlay "1" at 1756,2841 h50 r90
SW_RF: Top Overlay "1" at 1756,2146 h50 r90